# Altium PCB SENSEI_Debug-Board.PcbDoc (part 2 of 2)
Units mm, origin at the board's own origin, x right, y up, seen from the top; angles counter-clockwise.
Board outline 148 x 140 mm, 4 copper layers (Top Layer, GND/PWR1, GND/PWR2, Bottom Layer), stack 0.626 mm thick; 55 components, 116 nets, 460 pads, 677 vias.
Unrouted connection lines stored in the file: 54.
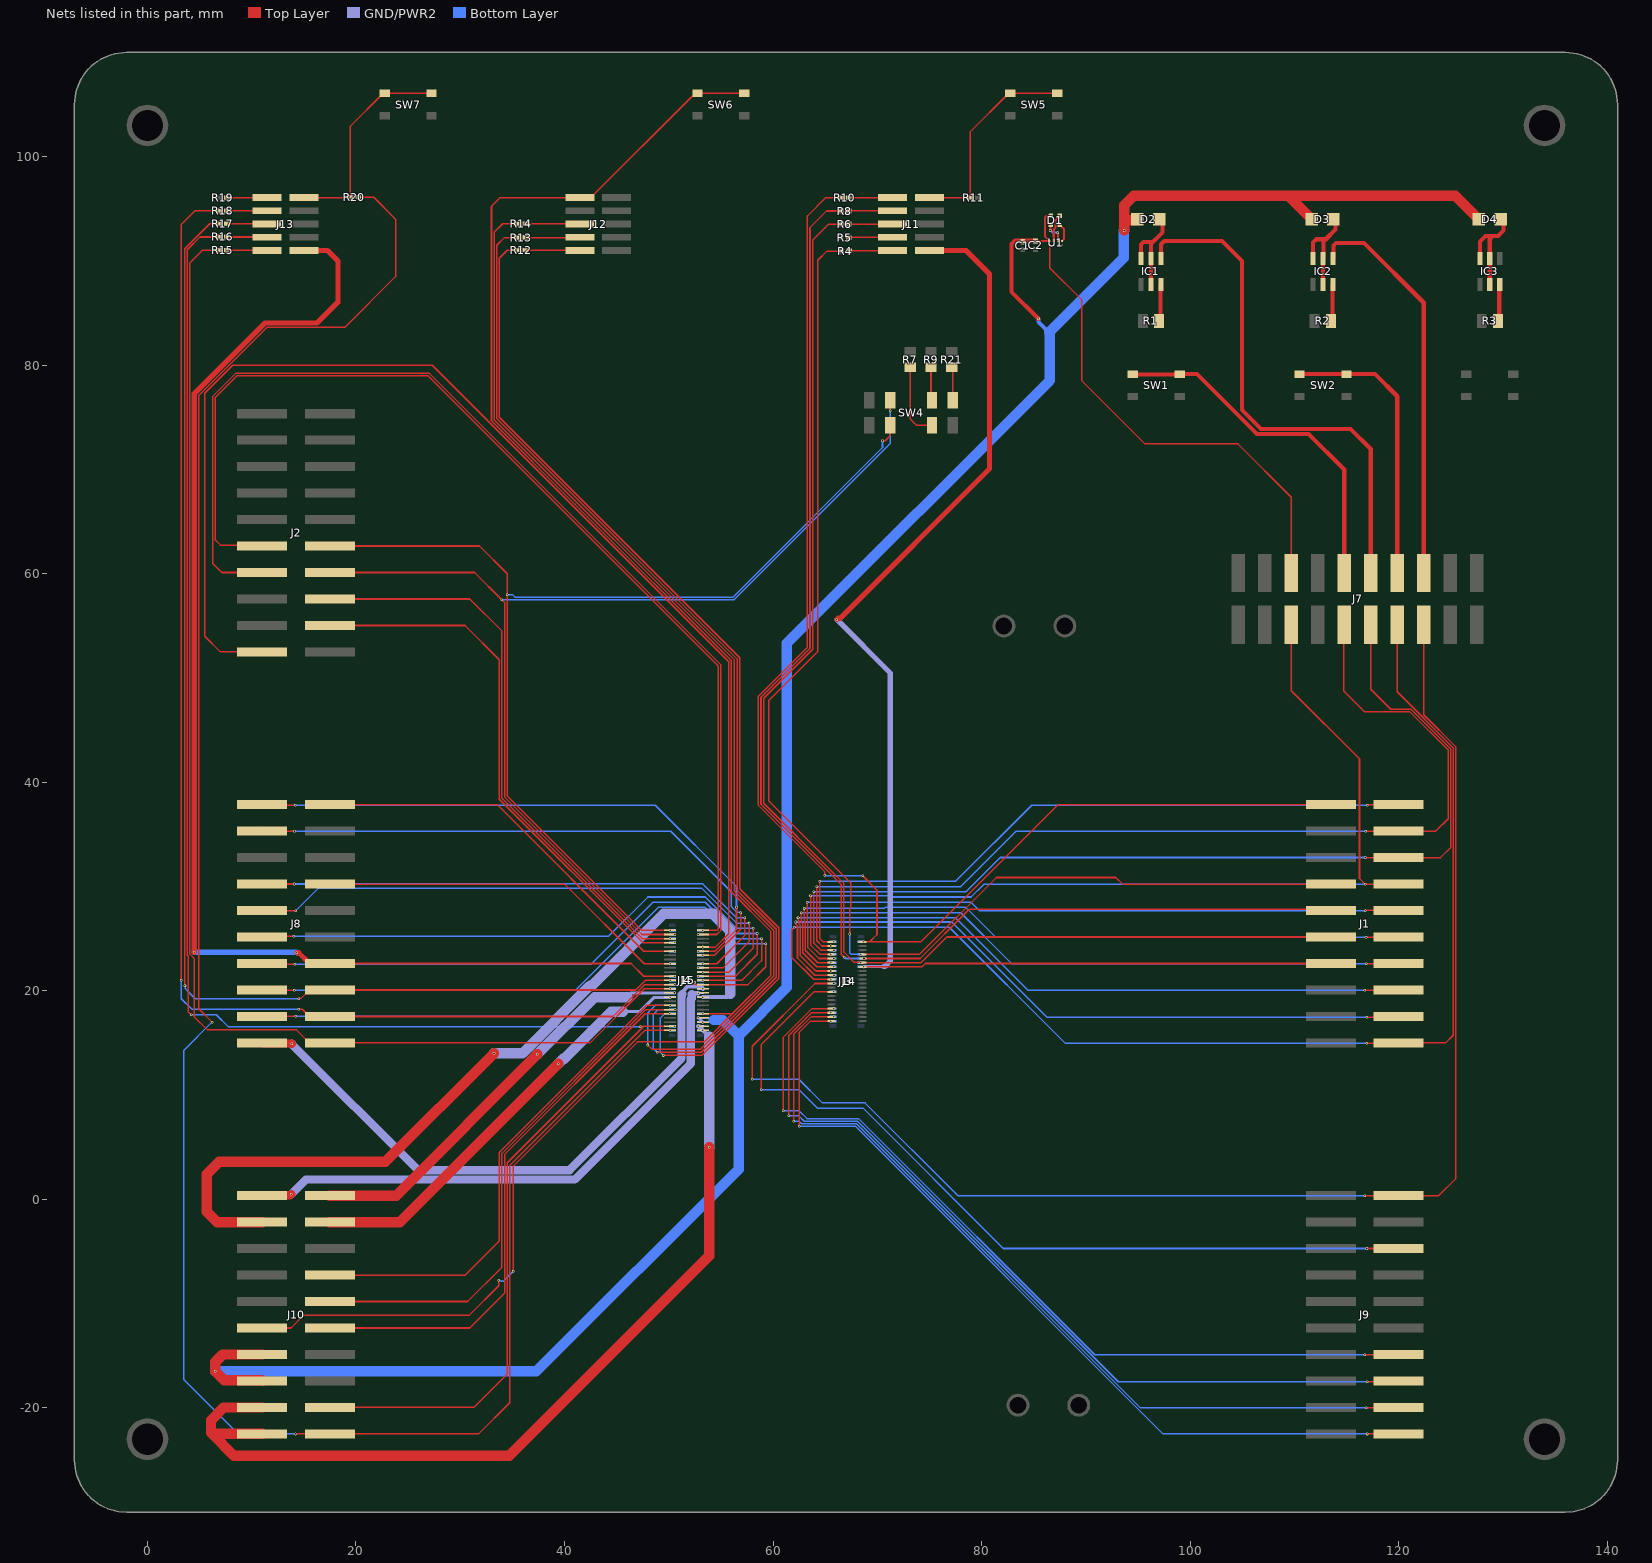
[diagram p4: the nets of this part, all layers, seen from the top]

## Via types
v1: diameter 0.25, hole 0.15, Top Layer to Bottom Layer, tented both sides, 677 vias

## Nets (pads, with @x,y where several pads share a name; then routed paths per layer and width w, separated by ;. In a path a pad name is that pad's centre, name@x,y a point inside that pad or via, vN(x,y) a via of type N, cw(c..) or ccw(c..) an arc to the next point about the centre after c; other vN are vias at no path point) (continued)
JTAG_TDI: J1.9 J3.9 J14.9 R8.2 | length 127.3
  Top Layer w0.15: R8.2@66.525,94.79 65.14,94.79 63.55,93.2 63.55,52.857 58.85,48.157 58.85,37.886 66.55,30.186 66.55,23.5 v1(66.825,23.225) ; v1(68.725,23.1) 74.1,23.1 78.82,27.82 113.38,27.82 J1.9@113.5,27.7
  Bottom Layer w0.15: v1(66.825,23.225) 66.852,23.225 66.977,23.1 J14.9@68.455,23.1
JTAG_TDO: J1.11 J3.11 J14.11 R6.2 | length 124.9
  Top Layer w0.15: R6.2@66.525,93.54 65.34,93.54 63.8,92 63.8,52.754 59.1,48.054 59.1,37.989 65.645,31.445 66.8,30.289 66.8,23.725 67.8,22.725 68.375,22.725 v1(68.4,22.7) ; J3.11@68.4,22.75 J3.11@68.64,22.75 ; J3.11@68.64,22.7 74.2,22.7 76.66,25.16 J1.11@113.5,25.16
JTAG_TMS/CS_RAM_GATE: J1.7 J3.7 J14.7 R4.2 | length 123.6
  Top Layer w0.15: R4.2@66.55,90.95 65.175,90.95 64.3,90.075 64.3,52.546 59.6,47.846 59.6,38.196 67.475,30.321 67.475,27.949 67.375,27.849 v1(67.375,25.45) ; J3.7@68.64,23.5 74.061,23.5 81.431,30.87 92.88,30.87 93.51,30.24 J1.7@113.5,30.24
  Bottom Layer w0.15: v1(67.375,25.45) 67.369,25.444 67.369,23.631 67.5,23.5 v1(68.4,23.5) J14.7@68.455,23.5
LED_G: D2.1 IC1.2 IC1.3 IC1.5 | length 9.6
  Top Layer w0.4: IC1.3@95.3,90.25 95.3,91.591 95.534,91.825 96.425,91.825 ; IC1.5@96.25,87.75 IC1.2@96.25,90.25 96.25,91.65 96.425,91.825 ; 96.587,91.987 96.425,91.825 ; D2.1@97.05,94 97.35,93.7 97.35,92.75 96.425,91.825
LED_R: D4.1 IC3.2 IC3.3 IC3.5 | length 10.3
  Top Layer w0.4: IC3.3@127.8,90.25 127.8,91.85 128.35,92.4 129.05,92.4 ; IC3.5@128.75,87.75 IC3.2@128.75,90.25 128.75,92.1 129.05,92.4 ; D4.1@129.8,94 130.075,93.725 130.075,92.925 129.55,92.4 129.05,92.4
LED_Y: D3.1 IC2.2 IC2.3 IC2.5 | length 9.7
  Top Layer w0.4: IC2.3@111.8,90.25 111.8,91.775 112.113,92.088 113.013,92.088 ; IC2.5@112.75,87.75 IC2.2@112.75,90.25 112.8,90.3 112.8,91.875 113.013,92.088 ; D3.1@113.75,94 113.959,93.791 113.959,93.034 113.013,92.088
MIC_CLK: J3.36 J9.16 J14.36 | length 81.7
  Top Layer w0.15: v1(61.5,8) 61.5,15.707 63.693,17.9 v1(65.525,17.9) ; v1(117,-17.5) 119.92,-17.5 J9.16@120,-17.42
  Bottom Layer w0.15: v1(61.5,8) 62.5,8 63,7.5 68.107,7.5 93.107,-17.5 v1(117,-17.5)
MIC_DATA: J3.34 J9.14 J14.34 | length 81.5
  Top Layer w0.15: v1(61,8.5) 61,15.561 63.739,18.3 J3.34@65.56,18.3 ; v1(116.745,-14.9) 119.98,-14.9 J9.14@120,-14.88
  Bottom Layer w0.15: v1(61,8.5) 62.5,8.5 63.25,7.75 68.211,7.75 90.861,-14.9 v1(116.745,-14.9)
  other v1: 65.825,18.3
MIC_THSEL: J3.38 J9.18 J14.38 | length 82
  Top Layer w0.15: v1(62,7.5) 62,15.854 63.646,17.5 J3.38@65.56,17.5 ; v1(116.901,-20) 119.96,-20 J9.18@120,-19.96
  Bottom Layer w0.15: v1(62,7.5) 62.5,7.5 62.75,7.25 68.004,7.25 95.254,-20 v1(116.901,-20)
  other v1: 65.825,17.5
MIC_WAKE: J3.40 J9.20 J14.40 | length 82.2
  Top Layer w0.15: v1(62.5,7) 62.5,16 63.6,17.1 v1(65.525,17.1) ; v1(117,-22.5) J9.20@120,-22.5
  Bottom Layer w0.15: v1(62.5,7) 67.9,7 97.4,-22.5 116.5,-22.5 v1(117,-22.5)
MSP_CS: J4.12 J8.17 J15.12 | length 64.3
  Top Layer w0.15: J8.17@11,17.54 11.023,17.563 v1(14.239,17.563) ; v1(52.507,20.825) 52.526,20.806 52.526,20.656 52.582,20.6 J4.12@53.275,20.6 57.6,20.6 59.3,22.3 v1(59.3,24.5)
  Bottom Layer w0.15: v1(14.239,17.563) 39.964,17.563 49.901,27.5 53.5,27.5 56.5,24.5 v1(59.3,24.5) ; v1(52.507,20.825) 52.526,20.806 52.526,20.669 52.595,20.6 J15.12@53.055,20.6
MSP_DR1: J4.13 J8.15 J15.13 | length 61
  Top Layer w0.15: J8.15@11,20.08 11.039,20.041 v1(14.075,20.041) ; v1(53.25,21) J4.13@53.275,21 57,21 58.9,22.9 v1(58.9,25)
  Bottom Layer w0.15: v1(14.075,20.041) 41.041,20.041 49,28 53.5,28 56.5,25 v1(58.9,25)
MSP_DR2: J2.19 J4.21 J15.21 | length 121.7
  Top Layer w0.15: J2.19@11,52.5 7,52.5 5.5,54 5.5,77.32 8.18,80 27.318,80 55.75,51.568 55.75,25.474 54.476,24.2 v1(53.275,24.2)
MSP_T\R\S\T\: J4.50 J10.20 J15.50 R20.2 | length 207.7
  Top Layer w0.15: v1(6.2,17) 4.925,18.275 4.925,77.099 11.451,83.625 18.925,83.625 23.8,88.5 23.8,94 21.7,96.1 R20.2@20.22,96.1 ; v1(14.2,-22.5) J10.20@17.5,-22.5 31.75,-22.5 34.75,-19.5 34.75,3.25 47.7,16.2 v1(50.125,16.2)
  Bottom Layer w0.15: v1(6.2,17) 3.5,14.3 3.5,-17.3 8.7,-22.5 v1(14.2,-22.5)
MSP_TCK: J4.49 J10.18 J15.49 R16.2 | length 182.2
  Top Layer w0.15: v1@4.25,17.623 4.2,17.673 v1(4.2,17.7) 3.9,18 3.9,23.345 3.825,23.42 3.825,91.075 5.05,92.3 R16.2@6.87,92.3 ; J10.18@15.545,-19.96 J10.18@17.5,-19.96 31.29,-19.96 34.5,-16.75 34.5,3.5 47.6,16.6 ; v1(47.281,16.567) 47.314,16.6 47.6,16.6 ; J4.49@49.659,16.6 47.6,16.6
  Bottom Layer w0.15: v1(4.2,17.7) 6.6,17.7 7.733,16.567 v1(47.281,16.567)
  other v1: 50.566,16.6
MSP_TDI: J4.39 J8.18 J15.39 R18.2 | length 127.3
  Top Layer w0.15: v1(3.25,21) 3.25,93.5 4.55,94.8 R18.2@6.87,94.8 ; v1(14.5,18.25) 14.515,18.235 14.85,18.235 15.545,17.54 J8.18@17.5,17.54 44.644,17.54 47.704,20.6 J4.39@50.125,20.6
  Bottom Layer w0.15: v1(3.25,21) 3.25,19.25 4.25,18.25 v1(14.5,18.25)
  other v1: 50.575,20.6
MSP_TDO: J4.38 J8.16 J15.38 R17.2 | length 122.9
  Top Layer w0.15: v1(3.6,20.5) 3.6,23.292 3.575,23.317 3.575,91.179 5.971,93.575 R17.2@6.845,93.575 ; v1(14.5,19.25) 14.519,19.269 14.734,19.269 15.545,20.08 J8.16@17.5,20.08 46.83,20.08 47.75,21 v1(50.125,21)
  Bottom Layer w0.15: v1(3.6,20.5) 3.619,20.481 3.619,20.219 4.588,19.25 v1(14.5,19.25)
MSP_TMS: J4.40 J8.20 J15.40 R15.2 | length 124.6
  Top Layer w0.15: R15.2@6.87,91.025 5.275,91.025 4.075,89.825 4.075,23.524 4.5,23.099 4.5,17.5 5.75,16.25 14.295,16.25 15.545,15 J8.20@17.5,15 42.457,15 47.657,20.2 v1(50.125,20.2)
MSP_VCC: J4.37 J8.14 J13.1 J15.37 | length 125.2
  Top Layer w0.15: J8.14@17.5,22.62 46.38,22.62 47.6,21.4 J4.37@50.125,21.4
  Top Layer w0.5: v1(4.5,23.7) 4.5,77.275 11.275,84.05 16.275,84.05 18.275,86.05 18.275,90 17.275,91 J13.1@15,91 ; v1(14.332,23.653) 14.512,23.653 15.545,22.62 J8.14@17.5,22.62
  Bottom Layer w0.5: v1(4.5,23.7) 14.285,23.7 v1(14.332,23.653)
  other v1: 50.575,21.4
NetD1_2: D1.2 U1.B2 | length 2.6
  Top Layer w0.2: U1.B2@86.925,91.925 86.925,93.017 87.075,93.167 87.075,93.9 D1.2@87.5,94.325
NetD1_3: D1.3 U1.D2 | length 1.8
  Top Layer w0.2: D1.3@87.5,93.475 87.9,93.075 87.9,92.1 U1.D2@87.725,91.925
NetD1_4: D1.4 U1.C2 | length 2.2
  Top Layer w0.2: v1(86.6,92.925) 86.61,92.935 86.61,93.435 D1.4@86.65,93.475 ; U1.C2@87.325,91.925 v1(87.325,92.725)
  Bottom Layer w0.2: v1(86.6,92.925) 86.614,92.925 86.814,92.725 v1(87.325,92.725)
NetIC1_6: IC1.6 R1.2 | length 3.6
  Top Layer w0.4: R1.2@97.026,84.25 97.15,84.374 97.15,87.7 IC1.6@97.2,87.75
NetIC2_6: IC2.6 R2.2 | length 3.6
  Top Layer w0.4: R2.2@113.5,84.25 113.65,84.4 113.65,87.7 IC2.6@113.7,87.75
NetIC3_6: IC3.6 R3.2 | length 3.6
  Top Layer w0.4: R3.2@129.526,84.25 129.65,84.374 129.65,87.7 IC3.6@129.7,87.75
NetJ11_2: J11.2 R4.1 | length 4.2
  Top Layer w0.15: R4.1@67.3,90.95 67.325,90.975 71.445,90.975 J11.2@71.47,91
NetJ11_4: J11.4 R5.1 | length 4.2
  Top Layer w0.15: R5.1@67.275,92.24 67.305,92.27 J11.4@71.47,92.27
NetJ11_6: J11.6 R6.1 | length 4.2
  Top Layer w0.15: R6.1@67.275,93.54 J11.6@71.47,93.54
NetJ11_8: J11.8 R8.1 | length 4.2
  Top Layer w0.15: R8.1@67.275,94.79 67.295,94.81 J11.8@71.47,94.81
NetJ11_9: J11.9 R11.1 SW5.1 SW5.2 | length 20.1
  Top Layer w0.15: J11.9@75,96.08 75.015,96.065 R11.1@78.9,96.065 78.9,102.365 82.61,106.075 SW5.1@82.75,106.075 SW5.2@87.25,106.075
NetJ11_10: J11.10 R10.1 | length 4.2
  Top Layer w0.15: R10.1@67.25,96.065 67.265,96.08 J11.10@71.47,96.08
NetJ12_2: J12.2 R12.1 | length 5.2
  Top Layer w0.15: R12.1@36.25,91.02 41.45,91.02 J12.2@41.47,91
NetJ12_4: J12.4 R13.1 | length 5.3
  Top Layer w0.15: R13.1@36.225,92.245 41.445,92.245 J12.4@41.47,92.27
NetJ12_6: J12.6 R14.1 | length 5.3
  Top Layer w0.15: R14.1@36.225,93.57 41.44,93.57 J12.6@41.47,93.54
NetJ13_2: J13.2 R15.1 | length 3.9
  Top Layer w0.15: R15.1@7.62,91.025 11.445,91.025 J13.2@11.47,91
NetJ13_4: J13.4 R16.1 | length 3.9
  Top Layer w0.15: R16.1@7.62,92.3 11.44,92.3 J13.4@11.47,92.27
NetJ13_6: J13.6 R17.1 | length 3.9
  Top Layer w0.15: R17.1@7.595,93.575 11.435,93.575 J13.6@11.47,93.54
NetJ13_8: J13.8 R18.1 | length 3.9
  Top Layer w0.15: R18.1@7.62,94.8 11.46,94.8 J13.8@11.47,94.81
NetJ13_9: J13.9 R20.1 SW7.1 SW7.2 | length 20.4
  Top Layer w0.15: J13.9@15,96.08 19.45,96.08 R20.1@19.47,96.1 19.47,102.935 22.61,106.075 SW7.1@22.75,106.075 SW7.2@27.25,106.075
NetJ13_10: J13.10 R19.1 | length 3.9
  Top Layer w0.15: R19.1@7.62,96.075 7.625,96.08 J13.10@11.47,96.08
NetR7_2: R7.2 SW4.6 | length 7.3
  Top Layer w0.15: R7.2@73.154,79.8 73.154,74.846 73.75,74.25 SW4.6@75.25,74.25
NetR9_2: R9.2 SW4.2 | length 3.2
  Top Layer w0.15: R9.2@75.154,79.8 75.154,76.746 SW4.2@75.25,76.65
NetR21_2: R21.2 SW4.1 | length 3.2
  Top Layer w0.15: R21.2@77.154,79.8 77.25,79.704 SW4.1@77.25,76.65
nRF_P0.04: J1.20 J3.20 J7.13 J14.20 | length 116.7
  Top Layer w0.15: v1(62.05,26.1) 61.8,25.85 61.8,23.2 63.9,21.1 v1(65.525,21.1) ; v1(116.961,14.958) 119.958,14.958 J1.20@120,15 124.5,15 125.25,15.75 125.25,43.293 119.87,48.673 J7.13@119.87,54.5
  Bottom Layer w0.15: v1(62.05,26.1) 76.9,26.1 88.042,14.958 v1(116.961,14.958)
nRF_P0.04_JUMPER: J7.14 SW2.1 SW2.2 | length 26.3
  Top Layer w0.4: SW2.1@110.5,79.15 SW2.2@115,79.15 117.75,79.15 119.87,77.03 J7.14@119.87,61
nRF_P0.05: J3.22 J7.15 J9.2 J14.22 | length 139.8
  Top Layer w0.15: v1(57.993,11.528) 58,11.535 58,14.682 64.018,20.7 J3.22@65.56,20.7 ; v1(116.769,0.343) 119.983,0.343 J9.2@120,0.36 123.86,0.36 125.5,2 125.5,43.396 122.41,46.486 J7.15@122.41,54.5
  Bottom Layer w0.15: v1(57.993,11.528) 62.472,11.528 64.75,9.25 68.832,9.25 77.739,0.343 v1(116.769,0.343)
  other v1: 65.825,20.7
nRF_P0.05_JUMPER: IC2.1 J7.16 | length 37.4
  Top Layer w0.4: IC2.1@113.7,90.25 113.75,90.3 113.75,91.475 114,91.725 116.675,91.725 122.41,85.99 J7.16@122.41,61
nRF_P0.07/AMUX: J3.26 J9.6 J14.26 | length 80.6
  Top Layer w0.15: v1(58.875,10.5) 58.875,14.85 63.925,19.9 J3.26@65.56,19.9 ; v1(116.928,-4.716) 119.996,-4.716 J9.6@120,-4.72
  Bottom Layer w0.15: v1(58.875,10.5) 62.5,10.5 64.25,8.75 68.625,8.75 82.09,-4.716 v1(116.928,-4.716)
  other v1: 65.825,19.9
nRF_P0.12_GAP_GPIO64: J1.12 J3.12 J14.12 | length 65.2
  Top Layer w0.15: v1(63,27.9) 63,26.635 63.1,26.535 63.1,23.9 64.3,22.7 v1(65.525,22.7) ; v1(116.872,25.154) 119.994,25.154 J1.12@120,25.16
  Bottom Layer w0.15: v1(63,27.9) 70.664,27.9 70.764,28 78.5,28 81.346,25.154 v1(116.872,25.154)
nRF_P0.31: J1.2 J3.2 J14.2 | length 65.2
  Top Layer w0.15: v1(64.5,30.5) 64.5,25 64.8,24.7 J3.2@65.56,24.7 ; v1(116.995,37.806) 117.049,37.86 J1.2@120,37.86
  Bottom Layer w0.15: v1(64.5,30.5) 77.5,30.5 84.806,37.806 v1(116.995,37.806)
  other v1: 65.825,24.7
nRF_P1.00_GAP_GPIO60: J1.4 J3.4 J7.9 J14.4 | length 94.7
  Top Layer w0.15: v1(64.2,30) 64.2,24.8 64.7,24.3 v1(65.525,24.3) ; J7.9@114.79,54.5 114.75,54.46 114.75,48.75 116.75,46.75 121.086,46.75 124.75,43.086 124.75,36.5 123.57,35.32 J1.4@120,35.32 116.887,35.32 v1(116.862,35.295)
  Bottom Layer w0.15: v1(64.2,30) 78,30 83.295,35.295 v1(116.862,35.295)
nRF_P1.00_GAP_GPIO60_JUMPER: J7.10 SW1.1 SW1.2 | length 33
  Top Layer w0.4: SW1.1@94.525,79.125 SW1.2@98.975,79.125 ; SW1.2@99,79.15 100.65,79.15 106.4,73.4 111.375,73.4 114.79,69.985 J7.10@114.79,61
nRF_P1.01_GAP_GPIO61: J1.6 J3.6 J7.11 J14.6 | length 94.8
  Top Layer w0.15: v1(63.9,29.5) 63.9,24.6 64,24.5 64.6,23.9 J3.6@65.56,23.9 ; v1(116.788,32.789) 116.797,32.78 J1.6@120,32.78 124.03,32.78 125,33.75 125,43.189 121.189,47 119.25,47 117.33,48.92 J7.11@117.33,54.5
  Bottom Layer w0.15: v1(63.9,29.5) 78.5,29.5 81.789,32.789 v1(116.788,32.789)
  other v1: 65.85,23.9
nRF_P1.01_GAP_GPIO61_JUMPER: IC1.1 J7.12 | length 49.2
  Top Layer w0.4: IC1.1@97.2,90.25 97.2,91.6 97.525,91.925 103.05,91.925 104.975,90 104.975,75.725 106.8,73.9 115.4,73.9 117.33,71.97 J7.12@117.33,61
nRF_P1.09_GAP_GPIO62: J1.8 J3.8 J7.5 J14.8 | length 91.2
  Top Layer w0.15: v1(63.6,29.1) 63.6,24.4 64.5,23.5 v1(65.525,23.5) ; J7.5@109.71,54.5 109.71,48.79 116.25,42.25 116.25,30.766 v1(116.788,30.228) 116.799,30.24 J1.8@120,30.24
  Bottom Layer w0.15: v1(63.6,29.1) 71.264,29.1 71.364,29 79,29 80.228,30.228 v1(116.788,30.228)
nRF_P1.09_GAP_GPIO62_JUMPER: J7.6 U1.A1 | length 45.4
  Top Layer w0.15: U1.A1@86.525,91.525 86.525,90.45 86.525,89.35 89.625,86.25 89.625,78.5 95.675,72.45 104.6,72.45 109.71,67.34 J7.6@109.71,61
nRF_P1.11_GAP_GPIO63: J1.10 J3.10 J14.10 | length 64.5
  Top Layer w0.15: v1(63.3,28.5) 63.3,26.688 63.35,26.638 63.35,24.15 64.4,23.1 J3.10@65.56,23.1 ; v1(116.802,27.69) 116.826,27.715 J1.10@120.407,27.715
  Bottom Layer w0.15: v1(63.3,28.5) 79,28.5 79.81,27.69 v1(116.802,27.69)
  other v1: 65.825,23.1
nRF_QSPI_CLK: J4.20 J8.1 J15.20 | length 57
  Top Layer w0.15: J8.1@11,37.86 11.045,37.815 v1(14.176,37.815) ; J4.20@53.275,23.8 54.43,23.8 56.5,25.87 v1(56.5,28)
  Bottom Layer w0.15: v1@14.133,37.803 48.697,37.803 56.5,30 v1(56.5,28)
  other v1: 52.825,23.8
nRF_QSPI_CS_CONN: J4.14 J8.13 J15.14 | length 59.3
  Top Layer w0.15: J8.13@11,22.62 11.059,22.561 v1(14.114,22.561) ; J4.14@53.275,21.4 56.4,21.4 58.5,23.5 v1(58.5,25.5)
  Bottom Layer w0.15: v1(14.114,22.561) 42.539,22.561 48.478,28.5 53.5,28.5 56.5,25.5 v1(58.5,25.5)
  other v1: 52.825,21.4
nRF_QSPI_IO0: J4.19 J8.3 J15.19 | length 56.7
  Top Layer w0.15: J8.3@10.63,35.69 J8.3@11,35.32 11.013,35.307 v1(14.103,35.307) ; v1(53.275,23.4) 54.383,23.4 56.9,25.917 v1(56.9,27.5)
  Bottom Layer w0.15: v1(14.103,35.307) 50.193,35.307 56,29.5 56,28.076 56.557,27.519 56.881,27.519 v1(56.9,27.5)
nRF_QSPI_IO1: J4.17 J8.7 J15.17 | length 54.5
  Top Layer w0.15: J8.7@11,30.24 11.004,30.244 v1(14.081,30.244) ; v1(53.275,22.6) 54.6,22.6 57.3,25.3 v1(57.3,27)
  Bottom Layer w0.15: v1(14.081,30.244) 16.431,30.244 16.438,30.25 53.25,30.25 56.5,27 v1(57.3,27)
nRF_QSPI_IO2: J4.16 J8.9 J15.16 | length 56.2
  Top Layer w0.15: J8.9@11,27.7 11.003,27.697 v1(14.238,27.697) ; J4.16@53.275,22.2 55.2,22.2 57.7,24.7 v1(57.7,26.5)
  Bottom Layer w0.15: v1(14.238,27.697) 16.358,29.817 53.183,29.817 56.5,26.5 v1(57.7,26.5)
  other v1: 52.825,22.2
nRF_QSPI_IO3: J4.15 J8.11 J15.15 | length 57.2
  Top Layer w0.15: J8.11@11.403,25.247 v1(14.027,25.247) ; v1(53.275,21.8) 55.8,21.8 58.1,24.1 v1(58.1,26)
  Bottom Layer w0.15: v1(14.027,25.247) 44.247,25.247 48,29 53.5,29 56.5,26 v1(58.1,26)
QVAR_IMU_1: J1.16 J3.16 J14.16 | length 68.4
  Top Layer w0.15: v1(62.4,27) 62.419,26.981 62.419,26.78 62.475,26.724 62.475,26.453 62.6,26.328 62.6,23.4 64.1,21.9 v1(65.525,21.9) ; v1(116.753,20.054) 120.497,20.054 J1.16@120.61,19.94
  Bottom Layer w0.15: v1(62.4,27) 77.5,27 84.446,20.054 v1(116.753,20.054)
QVAR_IMU_2: J1.18 J3.18 J14.18 | length 69.1
  Top Layer w0.15: v1(62.175,26.6) 62.194,26.581 62.194,26.38 62.35,26.224 62.35,23.15 64,21.5 J3.18@65.56,21.5 ; v1(116.945,17.472) 119.932,17.472 J1.18@120,17.54
  Bottom Layer w0.15: v1(62.175,26.6) 77.142,26.6 86.27,17.472 v1(116.945,17.472)
  other v1: 65.85,21.5
R\S\T\: J4.5 J10.11 J12.10 J15.5 SW6.1 SW6.2 | length 185.5
  Top Layer w0.15: J10.11@11,-12.34 13.76,-12.34 15,-11.1 30.887,-11.1 33.697,-8.289 v1(33.697,-7.775) ; v1(35.1,-6.9) 35.1,3.2 47,15.1 53.4,15.1 56.1,17.8 ; v1(53.275,17.8) 56.1,17.8 ; SW6.2@57.25,106.075 SW6.1@52.75,106.075 52.469,105.794 52.244,105.794 42.53,96.08 J12.10@41.47,96.08 33.83,96.08 33,95.25 33,74.672 41.02,66.652 56,51.672 56,29.5 59.8,25.7 59.8,21.5 56.1,17.8
  Bottom Layer w0.15: v1(33.697,-7.775) 33.716,-7.794 33.895,-7.794 33.972,-7.871 34.122,-7.871 35.093,-6.9 v1(35.1,-6.9)
RESET_N: J1.1 J3.1 J14.1 R10.2 | length 132.9
  Top Layer w0.15: v1(64.945,31.101) 64.979,31.135 64.979,31.404 58.6,37.782 58.6,48.261 63.3,52.961 63.3,94.325 65.04,96.065 R10.2@66.5,96.065 ; v1(68.599,31.027) 69.975,29.651 69.975,25.399 69.276,24.7 ; v1(68.7,24.7) 69.276,24.7 ; J1.1@113.5,37.86 87.36,37.86 74.2,24.7 69.276,24.7
  Bottom Layer w0.15: v1(64.945,31.101) 65.019,31.027 v1(68.599,31.027)
SPI_A_CLK: J4.31 J8.2 J15.31 | length 38.4
  Top Layer w0.15: J8.2@17.5,37.86 33.554,37.86 47.614,23.8 J4.31@50.125,23.8
  other v1: 50.575,23.8
SPI_A_CS: J2.16 J4.28 J15.28 | length 55.5
  Top Layer w0.15: J2.16@17.5,57.58 30.92,57.58 34,54.5 34,38.475 47.475,25 v1(50.125,25)
SPI_A_MISO: J4.34 J8.8 J15.34 | length 35.8
  Top Layer w0.15: J8.8@17.5,30.24 40.01,30.24 47.65,22.6 v1(50.125,22.6)
SPI_A_MOSI: J2.18 J4.29 J15.29 | length 53.1
  Top Layer w0.15: J2.18@17.5,55.04 30.46,55.04 33.75,51.75 33.75,38.371 47.521,24.6 J4.29@50.125,24.6
  other v1: 50.556,24.649
SPI_B_CLK: J2.14 J4.27 J15.27 SW4.3 | length 105.6
  Top Layer w0.15: J2.14@17.5,60.12 31.38,60.12 v1(33.993,57.507) ; v1@34,57.5 v1(33.993,57.507) ; J4.27@50.125,25.4 J4.27@50.125,25.4 47.427,25.401 34.25,38.578 34.25,57.25 v1(33.993,57.507) ; SW4.3@71.25,76.65 71.258,76.642 v1(71.258,75.619)
  Bottom Layer w0.15: v1(33.993,57.507) 56.257,57.507 71.25,72.5 71.25,75.612 v1(71.258,75.619)
  other v1: 50.566,25.4
SPI_B_CS: J2.13 J4.24 J15.24 | length 109.8
  Top Layer w0.15: J2.13@11,60.12 7.13,60.12 6.25,61 6.25,77.01 8.49,79.25 27.007,79.25 55,51.257 55,25.784 54.616,25.4 J4.24@53.275,25.4
  other v1: 52.825,25.4
SPI_B_MISO: J2.12 J4.26 J15.26 SW4.7 | length 105
  Top Layer w0.15: J2.12@17.5,62.66 31.84,62.66 34.5,60 v1(34.5,58) 34.5,38.682 47.382,25.8 v1(50.125,25.8) ; v1(70.5,72.75) 70.519,72.769 70.769,72.769 71.25,73.25 SW4.7@71.25,74.25
  Bottom Layer w0.15: v1(34.5,58) 35.007,58 35.25,57.757 56.153,57.757 70.5,72.104 v1(70.5,72.75)
SPI_B_MOSI: J2.11 J4.25 J15.25 | length 105.8
  Top Layer w0.15: J2.11@11,62.66 10.91,62.75 7,62.75 6.5,63.25 6.5,76.906 8.594,79 26.904,79 54.75,51.154 54.75,25.888 54.662,25.8 v1(53.275,25.8)
SWDCLK: J4.45 J10.10 J15.45 R13.2 | length 154.4
  Top Layer w0.15: J10.10@17.5,-9.8 30.7,-9.8 34,-6.5 34,4.396 47.804,18.2 J4.45@50.125,18.2 ; R13.2@35.475,92.245 34.245,92.245 33.5,91.5 33.5,74.9 45.139,63.261 45.139,63.239 56.55,51.829 56.55,29.657 60.3,25.907 60.3,21.293 53.107,14.1 v1(48.9,14.1)
  Bottom Layer w0.15: v1(48.9,14.1) 48.5,14.5 48.5,17.7 49,18.2 J15.45@50.345,18.2
  other v1: 50.6,18.2
SWDIO: J4.46 J10.12 J15.46 R12.2 | length 154.3
  Top Layer w0.15: J10.12@17.5,-12.34 30.91,-12.34 34.25,-9 34.25,4.293 47.757,17.8 J4.46@50.125,17.8 v1(50.1,17.8) ; R12.2@35.5,91.02 34.52,91.02 33.75,90.25 33.75,75.004 56.8,51.954 56.8,29.8 60.55,26.05 60.55,21.189 53.161,13.8 v1(49.475,13.8)
  Bottom Layer w0.15: v1(49.475,13.8) 49.2,14.075 49.2,17.4 49.6,17.8 v1(50.1,17.8) J15.46@50.345,17.8
SWO: J4.44 J10.8 J15.44 R14.2 | length 154
  Top Layer w0.15: J10.8@17.5,-7.26 30.49,-7.26 33.75,-4 33.75,4.5 47.85,18.6 v1(50.125,18.6) ; R14.2@35.475,93.57 34.07,93.57 33.25,92.75 33.25,74.775 56.3,51.725 56.3,29.554 60.05,25.804 60.05,21.396 53.054,14.4 48.4,14.4 v1(48,14.8)
  Bottom Layer w0.15: v1(48,14.8) 48,17.9 48.7,18.6 v1(50.125,18.6)
V_GAP9: J1.13 J3.13 J11.1 J14.13 | length 128.6
  Top Layer w0.15: v1(68.7,22.3) 74.3,22.3 74.62,22.62 J1.13@113.5,22.62
  Top Layer w0.5: v1(66.125,55.6) 66.25,55.725 66.425,55.725 80.775,70.075 80.775,88.75 78.525,91 J11.1@75,91
  GND/PWR2 w0.3: v1(68.7,22.3) 68.725,22.325 70.6,22.325
  GND/PWR2 w0.5: v1(66.125,55.6) 71.25,50.475 71.25,22.85 70.725,22.325 70.6,22.325
VA0: J4.41 J10.2 J15.41 | length 41.1
  Top Layer w1: J10.2@17.5,0.36 23.86,0.36 v1(37.4,13.9)
  GND/PWR2 w0.3: 46,19.4 46.4,19.8 v1(50.55,19.8)
  GND/PWR2 w1: v1(37.4,13.9) 42.9,19.4 46,19.4
VA1: J4.11 J8.19 J15.11 | length 58.4
  Top Layer w0.8: J8.19@11,15 11.045,14.955 13.789,14.955 v1(13.831,14.914)
  GND/PWR2 w0.4: 51.3,19.7 51.3,19.9 51.8,20.4 52.49,20.4 53.075,20.4 v1(53.275,20.2)
  GND/PWR2 w0.8: v1(13.831,14.914) 25.944,2.8 40.5,2.8 51.225,13.525 51.225,19.485 51.25,19.51 51.25,19.65 51.3,19.7
VBAT: J4.1 J4.2 J10.17 J10.19 J15.1 J15.2 | length 90.6
  Top Layer w1: J10.19@11,-22.5 6.2,-22.5 ; J10.17@11,-19.96 7.34,-19.96 6.1,-21.2 6.1,-22.4 6.2,-22.5 ; v1(53.9,5) 53.9,-5.4 34.7,-24.6 8.3,-24.6 6.2,-22.5
  GND/PWR2 w0.4: v1(52.825,16.6) 52.875,16.6 v1(53.275,16.2) 53.875,15.6 53.9,15.6
  GND/PWR2 w1: v1(53.9,5) 53.9,15.6
VD0: J4.42 J10.4 J15.42 | length 41.5
  Top Layer w1: J10.4@17.5,-2.18 24.22,-2.18 v1(39.4,13)
  GND/PWR2 w0.3: 45.6,18 47.2,18 48.55,19.35 v1(50.125,19.35)
  GND/PWR2 w1: v1(39.4,13) 39.9,13.5 40,13.5 44.5,18 45.6,18
VD1: J4.9 J10.3 J15.9 | length 79.4
  Top Layer w1: J10.3@11,-2.18 6.68,-2.18 5.7,-1.2 5.7,2.4 6.9,3.6 22.812,3.6 v1(33.242,14.031)
  GND/PWR2 w0.4: v1(53.275,19.4) 55.6,19.4 55.9,19.7
  GND/PWR2 w1: v1(33.242,14.031) 35.975,14.031 42.444,20.5 42.6,20.5 49.5,27.4 54.3,27.4 55.9,25.8 55.9,19.7
VD2: J4.10 J10.1 J15.10 | length 53.7
  Top Layer w0.8: J10.1@11,0.36 11.045,0.405 13.705,0.405 v1(13.8,0.5)
  GND/PWR2 w0.4: 52.2,19.7 52.275,19.775 v1(52.825,19.775)
  GND/PWR2 w0.8: v1(13.8,0.5) 15.2,1.9 41,1.9 52.125,13.025 52.125,19.184 52.2,19.259 52.2,19.7
VQPS_FUSE_1V8: J1.14 J3.14 J14.14 | length 66.5
  Top Layer w0.15: v1(62.7,27.5) 62.7,27.027 62.725,27.002 62.725,26.556 62.85,26.431 62.85,23.65 64.2,22.3 J3.14@65.56,22.3 ; v1(116.89,22.615) 119.995,22.615 J1.14@120,22.62
  Bottom Layer w0.15: v1(62.7,27.5) 78,27.5 82.885,22.615 v1(116.89,22.615)
  other v1: 65.825,22.3
Vsys: C1.1 C2.1 D1.1 D2.2 D3.2 D4.2 J4.3 J4.4 J10.13 J10.15 J15.3 J15.4 U1.A2 | length 239.4
  Top Layer w0.2: C2.1@85.079,91.975 85.117,91.936 85.129,91.925 85.15,91.925 U1.A2@86.525,91.925 86.075,92.375 86.075,94.175 86.2,94.3 86.625,94.3 D1.1@86.65,94.325
  Top Layer w0.4: C2.1@85.079,91.975 83.227,91.975 82.875,91.623 82.875,87.042 v1(85.459,84.458) ; C2.1@85.117,91.936 85.139,91.936 85.15,91.925 85.175,91.9 C2.1@85.175,91.879
  Top Layer w1: J10.15@11,-17.42 10.945,-17.365 7.365,-17.365 v1(6.5,-16.5) 6.5,-15.6 7.22,-14.88 J10.13@11,-14.88 ; v1(93.7,92.925) 93.7,93.575 ; D2.2@94.95,94 94.85,93.9 94.025,93.9 93.7,93.575 ; D3.2@111.65,94 109.4,96.25 ; D4.2@127.7,94 125.45,96.25 109.4,96.25 ; 93.7,93.575 93.7,95.35 94.6,96.25 109.4,96.25
  GND/PWR2 w0.3: v1(52.825,17.4) 52.875,17.4 v1(53.275,17)
  Bottom Layer w0.2: J15.3@53.055,17 53.9,17 54.1,17.2 53.9,17.4 J15.4@53.055,17.4
  Bottom Layer w0.4: v1(85.459,84.458) 85.459,84.166 86.475,83.15
  Bottom Layer w1: v1(6.5,-16.5) 37.3,-16.5 56.7,2.9 56.7,15.7 ; 54.3,17.2 55.2,17.2 56.7,15.7 ; v1(93.7,92.925) 93.65,92.925 93.65,90.325 86.475,83.15 86.533,83.092 86.533,78.533 61.325,53.325 61.325,20.325 56.7,15.7
pads on no net: J11.7 J12.7 J12.8 J13.7 J14.41 J14.42 J14.43 J14.44 J15.56 R19.2 SW4.4 SW4.5 SW4.8

## Polygon pours and split planes (outlines as drawn)
GND on GND/PWR1 "GND_L02_P000" (solid, remove dead copper, pour order 0): -20,-40 157.5,-40 157.5,127.5 -17.5,127.5
GND on Top Layer "GND_L01_P001" (solid, remove dead copper, pour order 1): -20,-40 157.5,-40 157.5,127.5 -17.5,127.5
GND on GND/PWR2 "GND_L03_P002" (solid, remove dead copper, pour order 2): -20,-40 157.5,-40 157.5,127.5 -17.5,127.5
GND on Bottom Layer "GND_L04_P003" (solid, remove dead copper, pour order 3): -20,-40 157.5,-40 157.5,127.5 -17.5,127.5

## Silkscreen, mask and mechanical layers (free items; w line width, h text height)
Top Overlay:
  drawing of 151 lines, arcs and shapes, not listed
  text "MSP Debug" at 7.123,103.42 h2.5
  text "nRF Debug" at 37.426,103.434 h2.5
  text "GAP Debug" at 67.162,103.42 h2.5
  text "Reset" at 22.173,100.212 h2.5
  text "Reset" at 52.173,100.212 h2.5
  text "Reset" at 82.173,100.212 h2.5
  text "RGB" at 84.723,97.198 h2.5
  text "Green" at 93.027,97.198 h2.5
  text "Yellow" at 109.716,97.212 h2.5
  text "Red" at 127.117,97.212 h2.5
  text "GAP Boot" at 56.655,80.199 h2.5
  text "select" at 54.68,78.024 h2.5
  text "GND" at 4.663,74.879 h1.5
  text "GND" at 21.1,74.879 h1.5
  text "Button 1" at 93.116,73.208 h2.5
  text "Button 2" at 108.97,73.208 h2.5
  text "Button 3" at 124.963,73.208 h2.5
  text "GND" at 4.663,72.339 h1.5
  text "GND" at 21.1,72.339 h1.5
  text "eMRAM" at 61.334,69.962 h2.5
  text "JTAG" at 77.486,69.948 h2.5
  text "GND" at 4.663,69.799 h1.5
  text "GND" at 21.1,69.799 h1.5
  text "GND" at 4.663,67.259 h1.5
  text "GND" at 21.1,67.259 h1.5
  text "For SENSEI Base Board v1.0, make sure that the GAP9 is connected to the SPI bus (controlled by nRF)" at 47,67.1 h1.5
  text "LED RGB" at 104.29,65.294 h1.5
  text "LED Green" at 117.806,65.165 h1.5 r90
  text "LED Red" at 127.923,65.151 h1.5 r90
  text "Button 1" at 115.2,65.122 h1.5 r90
  text "LED Yellow" at 122.948,65.111 h1.5 r90
  text "Button 2" at 120.3,65.035 h1.5 r90
  text "Button 3" at 125.375,65.03 h1.5 r90
  text "GND" at 4.663,64.719 h1.5
  text "GND" at 21.1,64.719 h1.5
  text "eFUSE" at 69.744,64.448 h2.5
  text "SPI_B_MOSI" at -0.299,62.304 h1.5
  text "SPI_B_MISO" at 21.1,62.304 h1.5
  text "SPI_B_CS" at 1.216,59.764 h1.5
  text "SPI_B_CLK" at 21.1,59.764 h1.5
  text "ADS_B_DR" at 0.432,57.224 h1.5
  text "SPI_A_CS" at 21.1,57.224 h1.5
  text "ADS_A_DR" at 0.432,54.684 h1.5
  text "SPI_A_MOSI" at 21.1,54.684 h1.5
  text "MSP_DR2" at 1.332,52.144 h1.5
  text "I2C_B_SCL" at 21.1,52.144 h1.5
  text "GND" at 79.725,51.146 h2.5
  text "GND" at 85.759,51.148 h2.5
  text "Connect jumpers to use buttons and LEDs" at 103.802,50.378 h1.5
  text "nRF_QSPI_CLK" at -2.253,37.504 h1.5
  text "SPI_A_CLK" at 21.1,37.504 h1.5
  text "RESET_N" at 104.026,37.504 h1.5
  text "nRF_P0.31" at 123.6,37.51 h1.5
  text "nRF_QSPI_IO0" at -1.743,34.964 h1.5
  text "I2C_B_SDA" at 21.1,34.964 h1.5
  text "JTAG_\T\R\S\T" at 100.893,34.964 h1.5
  text "nRF_P1.00_GAP_GPIO60" at 123.6,34.964 h1.5
  text "JTAG_TCK" at 103.179,32.424 h1.5
  text "nRF_P1.01_GAP_GPIO61" at 123.6,32.424 h1.5
  text "GND" at 4.663,32.299 h1.5
  text "GND" at 21.1,32.299 h1.5
  text "nRF_QSPI_IO1" at -1.562,29.884 h1.5
  text "SPI_A_MISO" at 21.1,29.884 h1.5
  text "JTAG_TMS/CS_RAM_GATE" at 92.735,29.884 h1.5
  text "nRF_P1.09_GAP_GPIO62" at 123.6,29.884 h1.5
  text "nRF_QSPI_IO2" at -1.738,27.344 h1.5
  text "I2C_A_SDA" at 21.1,27.344 h1.5
  text "JTAG_TDI" at 103.819,27.344 h1.5
  text "nRF_P1.11_GAP_GPIO63" at 123.6,27.344 h1.5
  text "nRF_QSPI_IO3" at -1.746,24.804 h1.5
  text "I2C_A_SCL" at 21.1,24.804 h1.5
  text "JTAG_TDO" at 103.089,24.804 h1.5
  text "nRF_P0.12_GAP_GPIO64" at 123.6,24.804 h1.5
  text "nRF_QSPI_CS_CONN" at -6.095,22.264 h1.5
  text "MSP_VCC" at 21.1,22.264 h1.5
  text "V_GAP9" at 104.843,22.264 h1.5
  text "VQPS_FUSE_1V8" at 123.601,22.264 h1.5
  text "MSP_DR1" at 1.507,19.724 h1.5
  text "MSP_TDO" at 21.1,19.724 h1.5
  text "QVAR_IMU_1" at 123.6,19.724 h1.5
  text "GND" at 107.163,19.599 h1.5
  text "MSP_CS" at 2.151,17.184 h1.5
  text "MSP_TDI" at 21.1,17.184 h1.5
  text "QVAR_IMU_2" at 123.6,17.184 h1.5
  text "GND" at 107.163,17.059 h1.5
  text "MSP_TMS" at 21.1,14.644 h1.5
  text "nRF_P0.04" at 123.6,14.65 h1.5
  text "VA1" at 5.215,14.517 h1.5
  text "GND" at 107.163,14.519 h1.5
  text "nRF_P0.05" at 123.6,0.01 h1.5
  text "VD2" at 4.966,-0.123 h1.5
  text "VA0" at 21.101,-0.115 h1.5
  text "GND" at 107.163,-0.121 h1.5
  text "ADS_START" at 123.6,-2.536 h1.5
  text "VD1" at 5.142,-2.663 h1.5
  text "VD0" at 21.101,-2.655 h1.5
  text "GND" at 107.163,-2.661 h1.5
  text "nRF_P0.07/AMUX" at 123.6,-5.076 h1.5
  text "GND" at 4.663,-5.201 h1.5
  text "GND" at 21.1,-5.201 h1.5
  text "GND" at 107.163,-5.201 h1.5
  text "ADS_CLK_EXT" at 123.6,-7.616 h1.5
  text "1V8" at 5.317,-7.735 h1.5
  text "SWO" at 21.1,-7.741 h1.5
  text "GND" at 107.163,-7.741 h1.5
  text "SENSEI / Debug Board v1.1 / S. Frey / P. Wiese" at 43.7,-9.875 h5
  text "GAP_GPIO46" at 101.706,-10.156 h1.5
  text "1V8" at 5.317,-10.275 h1.5
  text "SWDCLK" at 21.1,-10.281 h1.5
  text "AVSS" at 123.6,-10.281 h1.5
  text "GAP_GPIO47" at 101.706,-12.696 h1.5
  text "RST" at 4.95,-12.821 h1.5
  text "SWDIO" at 21.1,-12.821 h1.5
  text "BIAS" at 123.6,-12.821 h1.5
  text "Vsys" at 4.647,-15.219 h1.5
  text "EXT_CHG/VUSB" at 21.1,-15.236 h1.5
  text "GAP_GPIO50" at 101.709,-15.236 h1.5
  text "MIC_DATA" at 123.6,-15.236 h1.5
  text "Vsys" at 4.647,-17.759 h1.5
  text "EXT_CHG/VUSB" at 21.1,-17.776 h1.5
  text "GAP_GPIO51" at 101.89,-17.776 h1.5
  text "MIC_CLK" at 123.6,-17.776 h1.5
  text "MSP_TCK" at 21.1,-20.316 h1.5
  text "GAP_GPIO48" at 101.703,-20.316 h1.5
  text "MIC_THSEL" at 123.6,-20.316 h1.5
  text "VBAT" at 4.028,-20.441 h1.5
  text "MSP_TRST" at 21.1,-22.856 h1.5
  text "GAP_GPIO49" at 101.703,-22.856 h1.5
  text "MIC_WAKE" at 123.6,-22.856 h1.5
  text "VBAT" at 4.028,-22.981 h1.5
  text "GND" at 81.009,-23.588 h2.5
  text "GND" at 86.959,-23.602 h2.5
Board Layer Stack Bottom Overlay:
  drawing of 10 lines, arcs and shapes, not listed
  text "SENSEI / Debug PCB v1.0 / S. Frey" at 123,57 h5
Mechanical 1:
  the board outline again, w0.254
  text ".Pcb_File_Name_No_Path" at 45,12.5 h1.52